# Altium PCB PCB1.PcbDoc (part 1 of 3)
Units mm, origin at the board's own origin, x right, y up, seen from the top; angles counter-clockwise.
Board outline 100 x 48 mm, 4 copper layers (Top Layer, Top GND, Bottom VM, Bottom Layer), stack 1.513 mm thick; 171 components, 136 nets, 609 pads, 571 vias.
Unrouted connection lines stored in the file: 44.
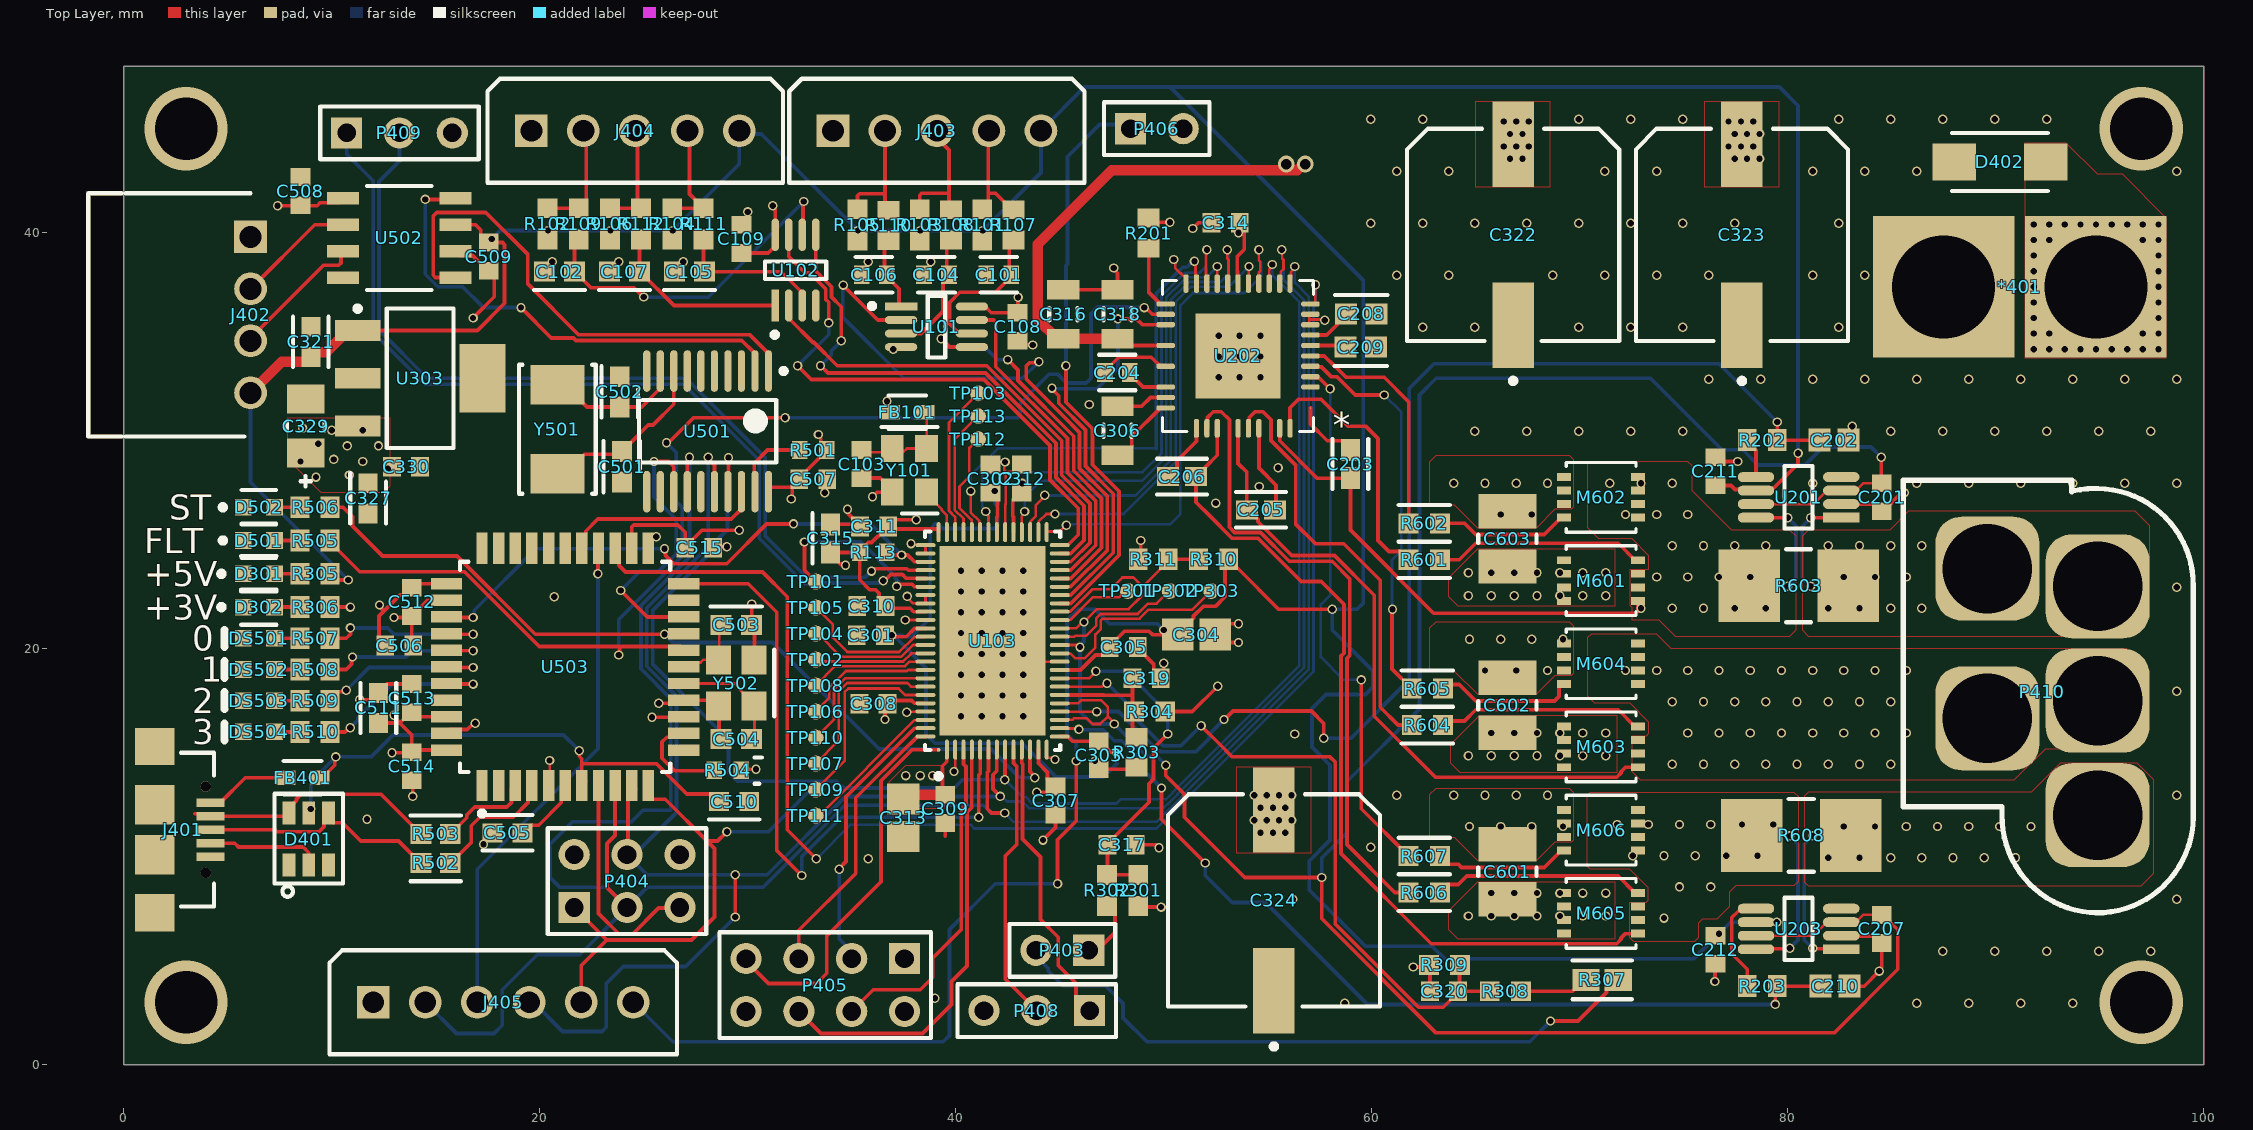
[diagram p0: Top Layer view]
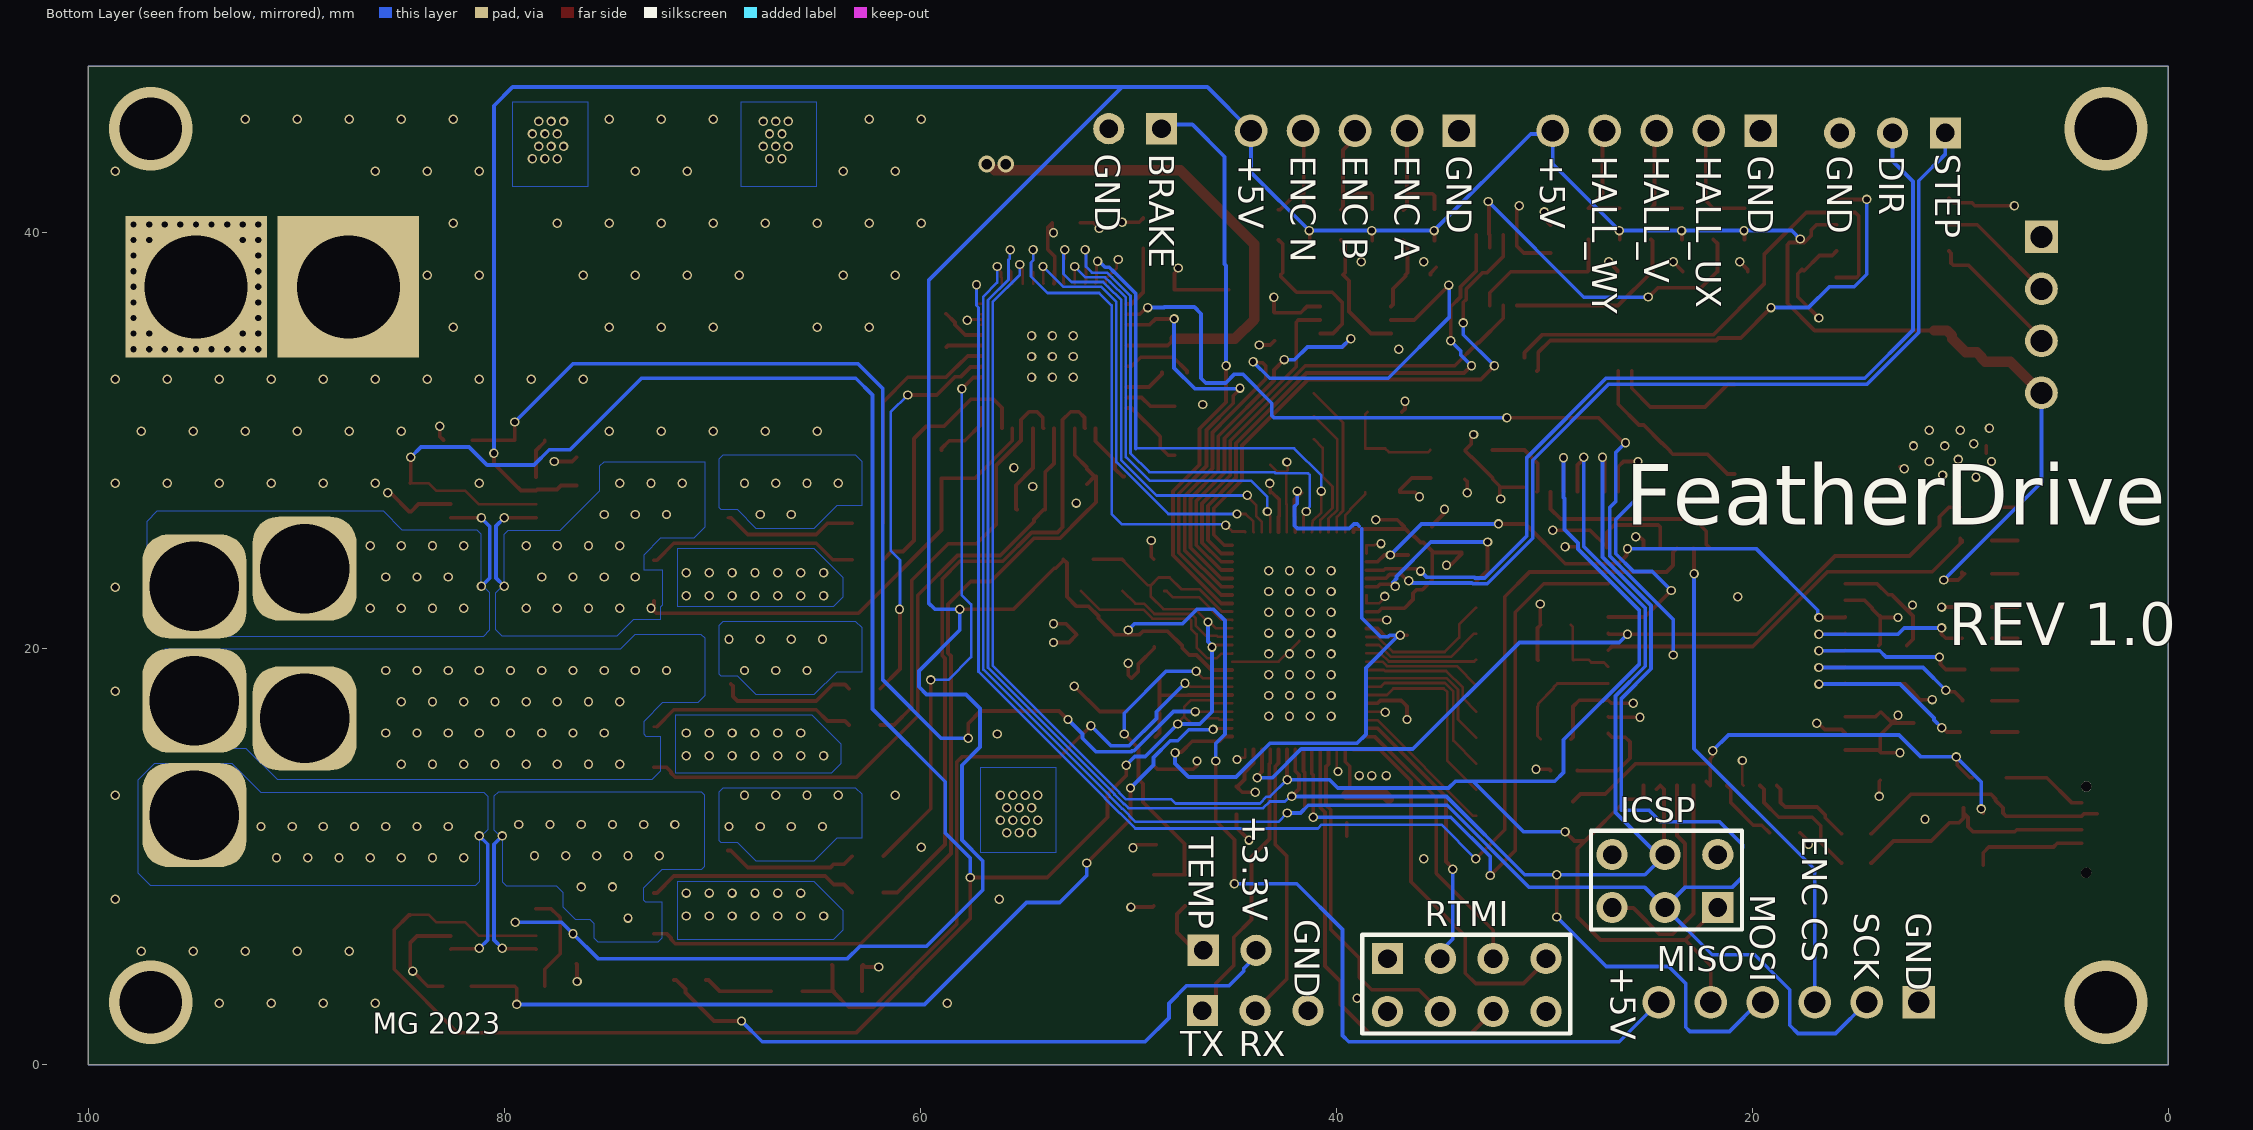
[diagram p1: Bottom Layer view, seen from below]
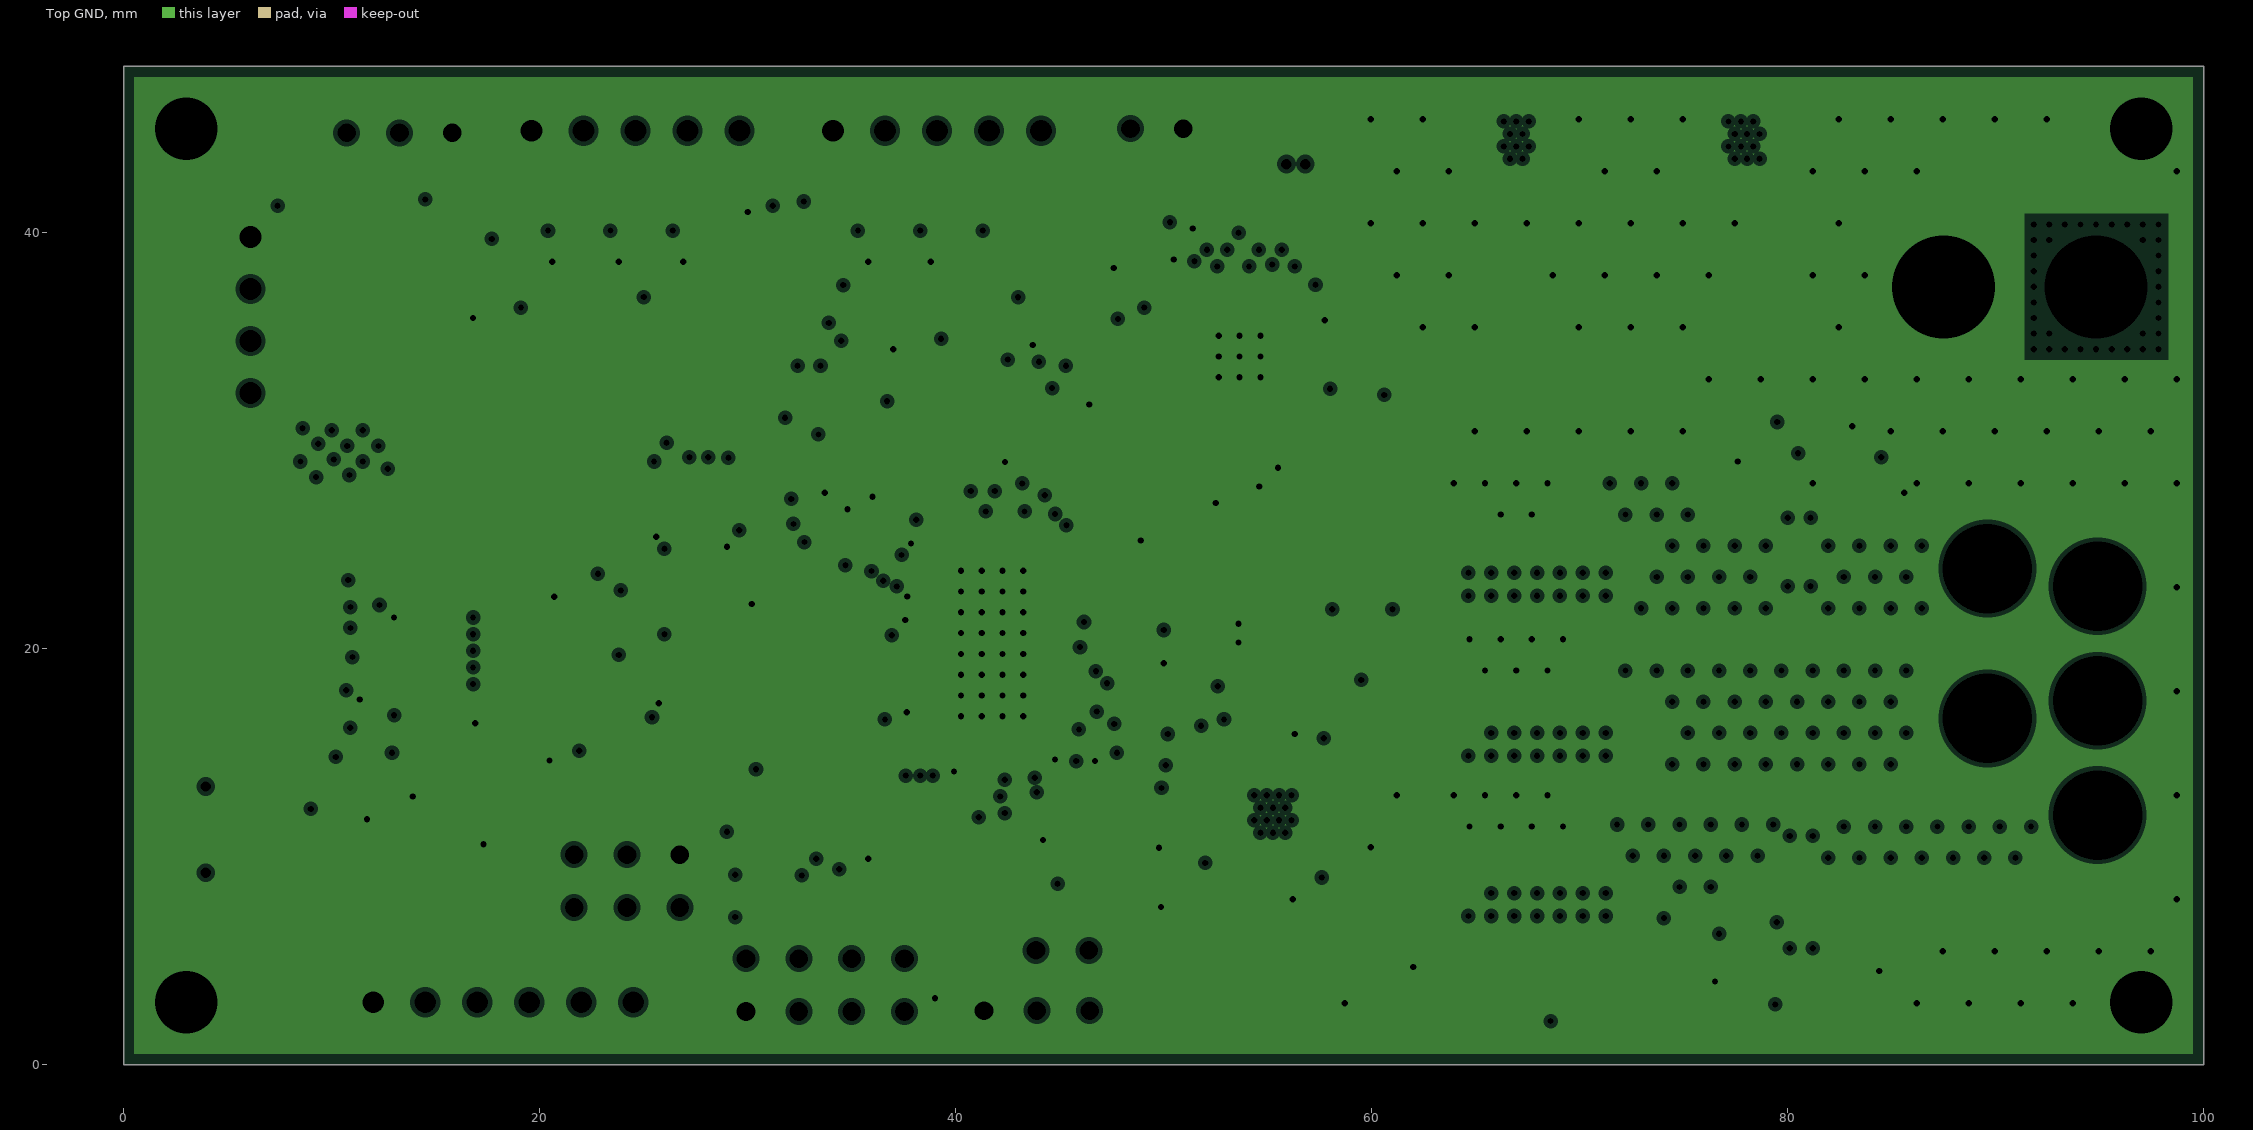
[diagram p2: Top GND, clearances drawn from the general rule]
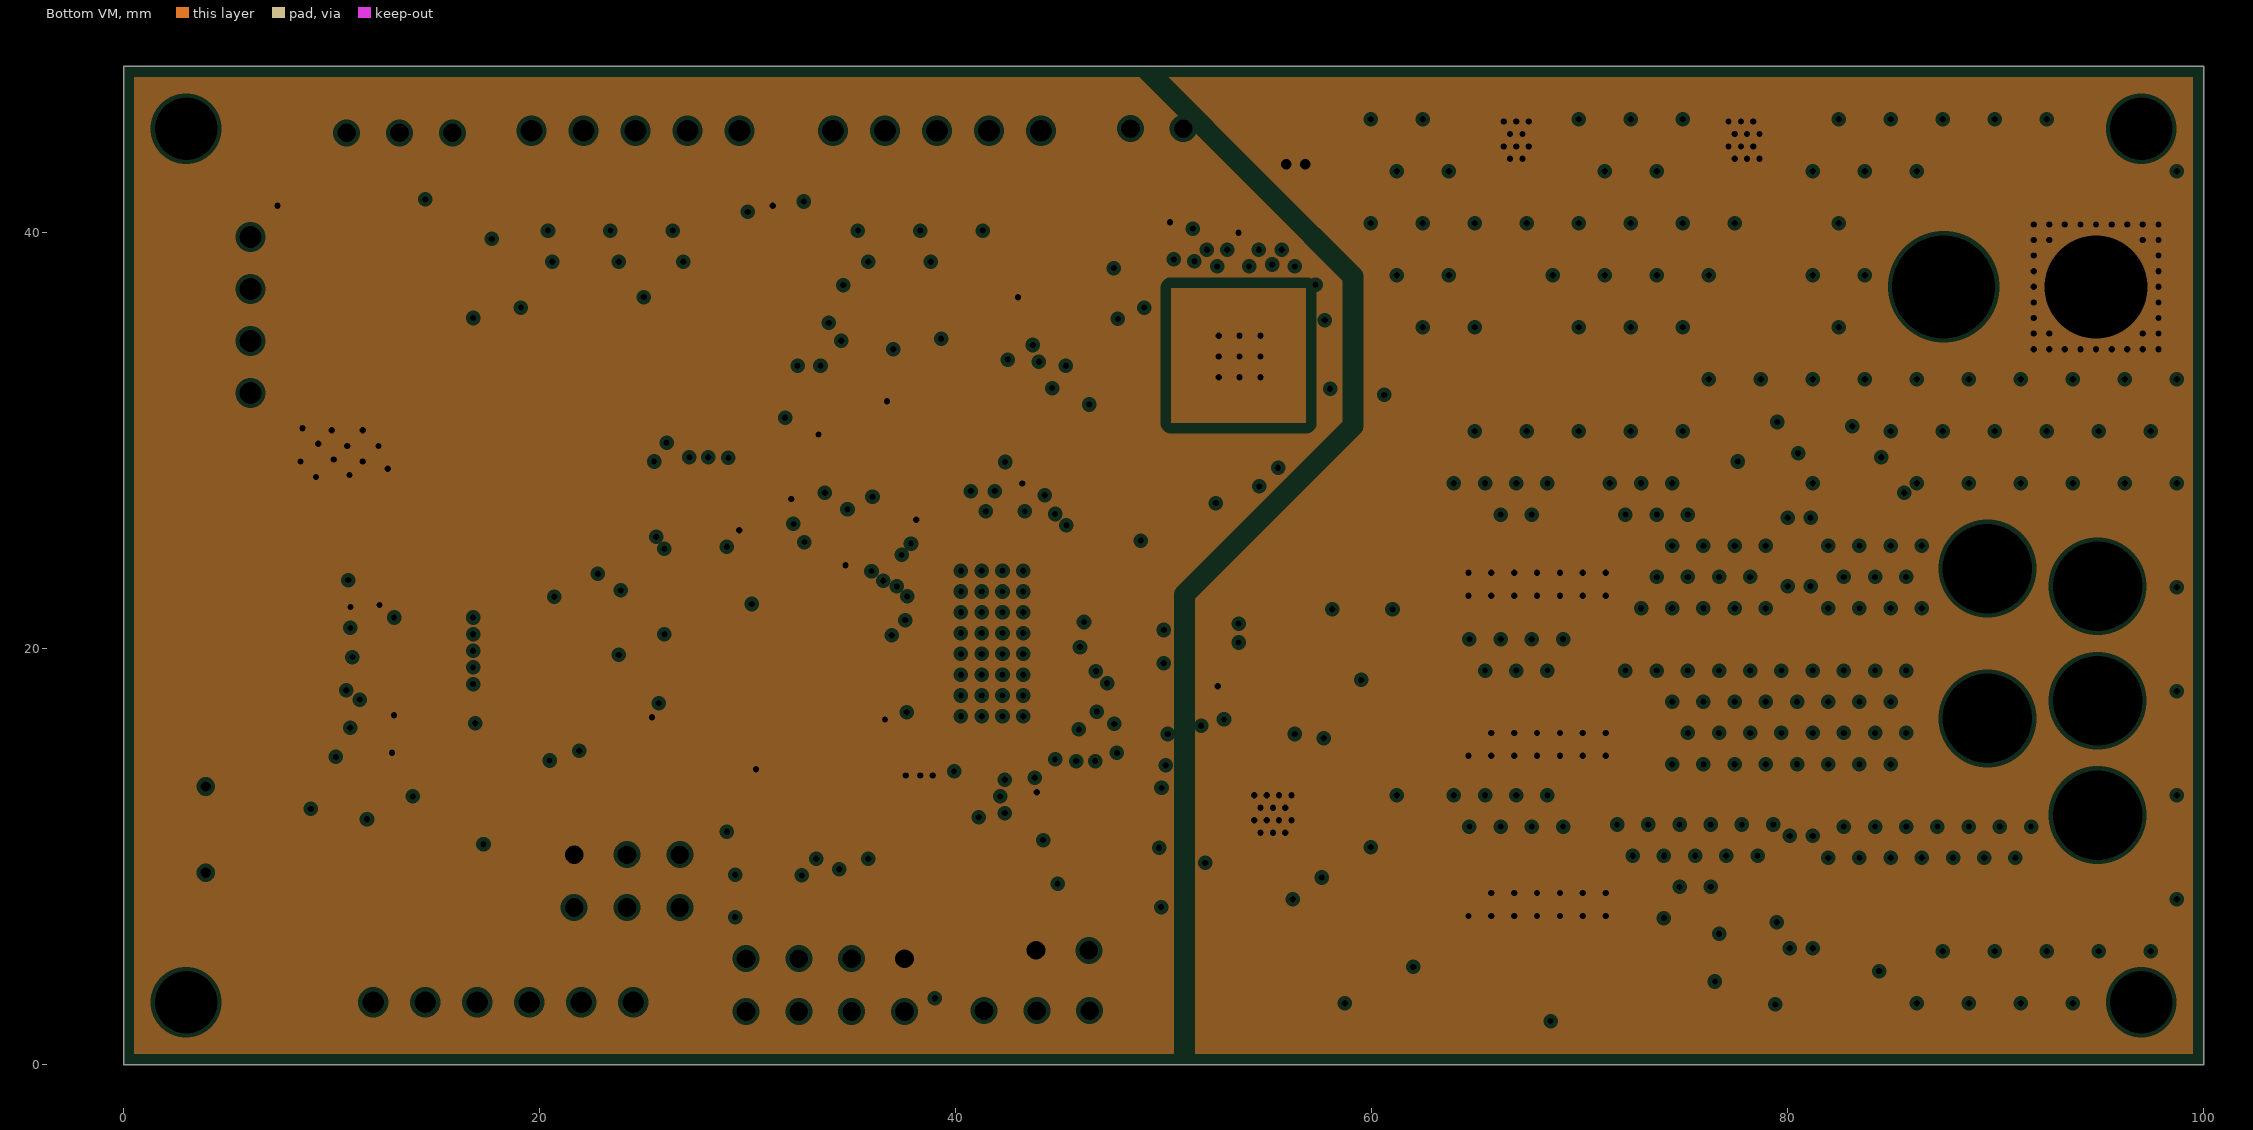
[diagram p3: Bottom VM, clearances drawn from the general rule]

## Layer stack, top to bottom
Top Solder: solder mask 0.0102, Solder Resist, Dk 3.5
Top Layer: signal copper 0.035
Dielectric 2: prepreg 0.2083, PP-022, Dk 4.5
Top GND: plane copper 0.018, net GND
Core: core 0.9906, Core-042, Dk 4.6
Bottom VM: plane copper 0.018, net (Multiple Nets)
Dielectric 3: prepreg 0.2083, PP-022, Dk 4.5
Bottom Layer: signal copper 0.035
Bottom Solder: solder mask 0.0102, Solder Resist, Dk 3.5

## Board outline
0,0 0,48 100,48 100,0

## Design rules (kind name [scope] priority, off if disabled: settings)
AssemblyTestPointUsage [All] p0: scope1count=1 scope1_0_kind=Board scope1_0_value=Board scope2count=1 scope2_0_kind=Board scope2_0_value=Board commentlength=0
AssemblyTestpoint [All] p0: scope1count=1 scope1_0_kind=Board scope1_0_value=Board scope2count=1 scope2_0_kind=Board scope2_0_value=Board commentlength=0
Clearance Clearance_POWER [All] p0 off: scope1count=1 scope1_0_kind=Board scope1_0_value=Board scope2count=1 scope2_0_kind=Board scope2_0_value=Board commentlength=162 gap=0.254 // Protel DXP Scope 1 Expression Was: (InNet('NetC205_2') OR InNet('NETC203_2') OR InNet('NETC206_2') OR InNet('NetP410_1') OR InNet('NetP410_3') OR InNet('VM'))
Clearance [All] p0: scope1count=1 scope1_0_kind=Board scope1_0_value=Board scope2count=1 scope2_0_kind=Board scope2_0_value=Board commentlength=0 gap=0.127
Clearance Clearance_POWER [(InNet('NetC205_2') OR InNet('NETC203_2') OR InNet('NETC206_2') OR InNet('NetP410_1') OR InNet('NetP410_3') OR InNet('VM'))] p1: gap=0.254 ignorepadtopadclearanceinfootprint=FALSE except(0: SMDPad-Hole THPad-Hole Via-Hole Fill-Hole Poly-Hole Region-Hole Text-Hole; 0.1: Arc-Arc Arc-Track Track-Track; 0.127: Arc-THPad Arc-Fill Arc-Poly Arc-Region Track-THPad Track-Fill Track-Poly Track-Region SMDPad-SMDPad; 0.2: Arc-SMDPad Track-SMDPad; 0.5: THPad-THPad THPad-Fill THPad-Poly THPad-Region Fill-Fill Fill-Poly Fill-Region Poly-Poly Poly-Region Region-Region)
Clearance [All] p2: gap=0.127 ignorepadtopadclearanceinfootprint=FALSE except(0: SMDPad-Hole THPad-Hole Via-Hole Fill-Hole Poly-Hole Region-Hole Text-Hole; 0.1: Arc-Arc Arc-Track Track-Track; 0.2: Arc-SMDPad Track-SMDPad THPad-Fill THPad-Poly THPad-Region Via-Fill Via-Poly Via-Region; 0.254: Arc-Via Arc-Text Arc-Hole Track-Via Track-Text Track-Hole SMDPad-THPad SMDPad-Via SMDPad-Text THPad-Via THPad-Text Via-Via Via-Text Fill-Text Poly-Text Region-Text Text-Text; 0.5: THPad-THPad)
ComponentClearance [All] p0: scope1count=1 scope1_0_kind=Board scope1_0_value=Board scope2count=1 scope2_0_kind=Board scope2_0_value=Board commentlength=0 gap=0.127 collisioncheckmode=3
ComponentClearance [All] p1: gap=0.127 collisioncheckmode=3 verticalgap=0.254 showdistances=FALSE
DiffPairsRouting [All] p0: scope1count=1 scope1_0_kind=Board scope1_0_value=Board scope2count=1 scope2_0_kind=Board scope2_0_value=Board commentlength=0
FabricationTestPointUsage [All] p0: scope1count=1 scope1_0_kind=Board scope1_0_value=Board scope2count=1 scope2_0_kind=Board scope2_0_value=Board commentlength=0 valid=0 allowmultiple=FALSE
FabricationTestpoint [All] p0: scope1count=1 scope1_0_kind=Board scope1_0_value=Board scope2count=1 scope2_0_kind=Board scope2_0_value=Board commentlength=0 side=3 testpointundercomponent=TRUE minsize=1.016 maxsize=2.54 preferedsize=1.524 minholesize=0 maxholesize=1.016 preferedholesize=0.813 testpointgrid=0.025
FanoutControl Fanout_BGA [All] p0 off: scope1count=1 scope1_0_kind=Board scope1_0_value=Board scope2count=1 scope2_0_kind=Board scope2_0_value=Board commentlength=69 // Protel DXP Scope 1 Expression Was: IsBGA   Fanout_BGA (Default Rule)
FanoutControl Fanout_LCC [All] p0 off: scope1count=1 scope1_0_kind=Board scope1_0_value=Board scope2count=1 scope2_0_kind=Board scope2_0_value=Board commentlength=69 // Protel DXP Scope 1 Expression Was: IsLCC   Fanout_LCC (Default Rule)
FanoutControl Fanout_SOIC [All] p0 off: scope1count=1 scope1_0_kind=Board scope1_0_value=Board scope2count=1 scope2_0_kind=Board scope2_0_value=Board commentlength=71 // Protel DXP Scope 1 Expression Was: IsSOIC   Fanout_SOIC (Default Rule)
FanoutControl Fanout_Small [All] p0 off: scope1count=1 scope1_0_kind=Board scope1_0_value=Board scope2count=1 scope2_0_kind=Board scope2_0_value=Board commentlength=84 // Protel DXP Scope 1 Expression Was: (CompPinCount < 5)   Fanout_Small (Default Rule)
FanoutControl Fanout_Default [All] p0: scope1count=1 scope1_0_kind=Board scope1_0_value=Board scope2count=1 scope2_0_kind=Board scope2_0_value=Board commentlength=30 // Fanout_Default (Default Rule)
Height [All] p0: scope1count=1 scope1_0_kind=Board scope1_0_value=Board scope2count=1 scope2_0_kind=Board scope2_0_value=Board commentlength=0
HoleSize [All] p0: scope1count=1 scope1_0_kind=Board scope1_0_value=Board scope2count=1 scope2_0_kind=Board scope2_0_value=Board commentlength=0 absolutevalues=TRUE maxlimit=6.5 minlimit=0.025 maxpercent=80.000 minpercent=20.000
HoleSize [All] p1: absolutevalues=TRUE maxlimit=6.5 minlimit=0.025 maxpercent=80.000 minpercent=20.000
HoleToHoleClearance [All] p0: scope1count=1 scope1_0_kind=Board scope1_0_value=Board scope2count=1 scope2_0_kind=Board scope2_0_value=Board commentlength=0
LayerPairs [All] p0: scope1count=1 scope1_0_kind=Board scope1_0_value=Board scope2count=1 scope2_0_kind=Board scope2_0_value=Board commentlength=0 enforce=TRUE
MinimumSolderMaskSliver [All] p0: scope1count=1 scope1_0_kind=Board scope1_0_value=Board scope2count=1 scope2_0_kind=Board scope2_0_value=Board commentlength=0
MinimumSolderMaskSliver [All] p1: minsoldermaskwidth=0.08
NetAntennae [All] p0: scope1count=1 scope1_0_kind=Board scope1_0_value=Board scope2count=1 scope2_0_kind=Board scope2_0_value=Board commentlength=0
PasteMaskExpansion [All] p0: scope1count=1 scope1_0_kind=Board scope1_0_value=Board scope2count=1 scope2_0_kind=Board scope2_0_value=Board commentlength=0 expansion=0
PlaneClearance [All] p0: scope1count=1 scope1_0_kind=Board scope1_0_value=Board scope2count=1 scope2_0_kind=Board scope2_0_value=Board commentlength=0 clearance=0.2
PlaneClearance [All] p1: clearance=0.2
PlaneConnect [All] p0: scope1count=1 scope1_0_kind=Board scope1_0_value=Board scope2count=1 scope2_0_kind=Board scope2_0_value=Board commentlength=0 planeconnectstyle=Direct reliefexpansion=0.508 reliefentries=4 reliefconductorwidth=0.254 reliefairgap=0.254
PlaneConnect [All] p1: planeconnectstyle=Direct reliefexpansion=0.508 reliefentries=4 reliefconductorwidth=0.254 reliefairgap=0.254
PolygonConnect PolygonConnect_GND_POWER [All] p0 off: scope1count=1 scope1_0_kind=Net scope1_0_value=GND scope2count=1 scope2_0_kind=Board scope2_0_value=Board commentlength=259 connectstyle=Direct reliefconductorwidth=0.254 reliefentries=4 polygonreliefangle="90 Angle" // Protel DXP Scope 2 Expression Was: (HasFootprint('FP-FC-G-MFG') OR HasFootprint('FP-CL32-IPC_B') OR HasFootprint('TSON Advance_TOS') OR HasFootprint('XT60+MR60') OR HasFootprint('XT-60') OR HasFootprint('FP-SMAJ-CA-MFG') OR InNamedPolygon('GND_L01_P000'))
PolygonConnect PolygonConnect_GND [All] p0: scope1count=1 scope1_0_kind=Net scope1_0_value=GND scope2count=1 scope2_0_kind=Board scope2_0_value=Board commentlength=0 connectstyle=Direct reliefconductorwidth=0.254 reliefentries=4 polygonreliefangle="90 Angle"
PolygonConnect [All] p0: scope1count=1 scope1_0_kind=Board scope1_0_value=Board scope2count=1 scope2_0_kind=Board scope2_0_value=Board commentlength=0 connectstyle=Direct reliefconductorwidth=0.254 reliefentries=4 polygonreliefangle="90 Angle"
PolygonConnect PolygonConnect_GND_POWER [InNet('GND') vs (HasFootprint('FP-FC-G-MFG') OR HasFootprint('FP-CL32-IPC_B') OR HasFootprint('TSON Advance_TOS') OR HasFootprint('XT60+MR60') OR HasFootprint('XT-60') OR HasFootprint('FP-SMAJ-CA-MFG') OR InNamedPolygon('GND_L01_P000'))] p1: connectstyle=Direct reliefconductorwidth=0.254 reliefentries=4 polygonreliefangle="90 Angle" airgapwidth=0.254
PolygonConnect PolygonConnect_GND [InNet('GND')] p2: thpad.connectstyle=Direct thpad.reliefconductorwidth=0.254 thpad.reliefentries=4 thpad.polygonreliefangle="90 Angle" thpad.airgapwidth=0.254 smdpad.connectstyle=Relief smdpad.reliefconductorwidth=0.2 smdpad.reliefentries=4 smdpad.polygonreliefangle="90 Angle" smdpad.airgapwidth=0.2 via.connectstyle=Direct via.reliefconductorwidth=0.254 via.reliefentries=4 via.polygonreliefangle="90 Angle" via.airgapwidth=0.254
PolygonConnect [All] p3: connectstyle=Direct reliefconductorwidth=0.254 reliefentries=4 polygonreliefangle="90 Angle" airgapwidth=0.254
RoutingCorners [All] p0: scope1count=1 scope1_0_kind=Board scope1_0_value=Board scope2count=1 scope2_0_kind=Board scope2_0_value=Board commentlength=0 cornerstyle=45-Degree minsetback=2.54 maxsetback=2.54
RoutingLayers [All] p0: scope1count=1 scope1_0_kind=Board scope1_0_value=Board scope2count=1 scope2_0_kind=Board scope2_0_value=Board commentlength=0 top layer=Automatic bottom layer=Automatic
RoutingPriority [All] p0: scope1count=1 scope1_0_kind=Board scope1_0_value=Board scope2count=1 scope2_0_kind=Board scope2_0_value=Board commentlength=0
RoutingTopology [All] p0: scope1count=1 scope1_0_kind=Board scope1_0_value=Board scope2count=1 scope2_0_kind=Board scope2_0_value=Board commentlength=0 topology=Shortest
RoutingVias [All] p0: scope1count=1 scope1_0_kind=Board scope1_0_value=Board scope2count=1 scope2_0_kind=Board scope2_0_value=Board commentlength=0 holewidth=0.3 width=0.45 viastyle="Through Hole" minholewidth=0.3 minwidth=0.45 maxholewidth=0.55 maxwidth=0.7
RoutingVias [All] p1: holewidth=0.3 width=0.45 viastyle="Through Hole" minholewidth=0.3 minwidth=0.45 maxholewidth=0.55 maxwidth=0.7
ShortCircuit [All] p0: scope1count=1 scope1_0_kind=Board scope1_0_value=Board scope2count=1 scope2_0_kind=Board scope2_0_value=Board commentlength=0 allowed=FALSE
SilkToBoardRegionClearance [All] p0: scope1count=1 scope1_0_kind=Board scope1_0_value=Board scope2count=1 scope2_0_kind=Board scope2_0_value=Board commentlength=0
SilkToSilkClearance [All] p0: scope1count=1 scope1_0_kind=Board scope1_0_value=Board scope2count=1 scope2_0_kind=Board scope2_0_value=Board commentlength=0
SilkToSilkClearance [All] p1: silktosilkclearance=0
SilkToSolderMaskClearance [All] p0 off: scope1count=1 scope1_0_kind=Board scope1_0_value=Board scope2count=1 scope2_0_kind=Board scope2_0_value=Board commentlength=44 // Protel DXP Scope 1 Expression Was: IsPad
SilkToSolderMaskClearance [IsPad] p1: minsilkscreentomaskgap=0.15 clearancetoexposedcopper=TRUE
SolderMaskExpansion [All] p0: scope1count=1 scope1_0_kind=Board scope1_0_value=Board scope2count=1 scope2_0_kind=Board scope2_0_value=Board commentlength=0 expansion=0.1
SolderMaskExpansion [All] p1: expansion=0.1 istentingtop=FALSE
UnRoutedNet [All] p0: scope1count=1 scope1_0_kind=Board scope1_0_value=Board scope2count=1 scope2_0_kind=Board scope2_0_value=Board commentlength=0
UnpouredPolygon [All] p0: scope1count=1 scope1_0_kind=Board scope1_0_value=Board scope2count=1 scope2_0_kind=Board scope2_0_value=Board commentlength=0
Width Width_voltage [All] p0: scope1count=1 scope1_0_kind=NetClass scope1_0_value=Voltage scope2count=1 scope2_0_kind=Board scope2_0_value=Board commentlength=0 maxlimit=0.5 minlimit=0.18 preferedwidth=0.18
Width [All] p0: scope1count=1 scope1_0_kind=Board scope1_0_value=Board scope2count=1 scope2_0_kind=Board scope2_0_value=Board commentlength=0 maxlimit=0.5 minlimit=0.127 preferedwidth=0.18
Width Width_voltage [InNetClass('Voltage')] p1: maxlimit=0.5 minlimit=0.18 preferedwidth=0.18 minimp=50.000000 maximp=50.000000 favimp=50.000000
Width [All] p2: maxlimit=0.5 minlimit=0.127 preferedwidth=0.18 minimp=50.000000 maximp=50.000000 favimp=50.000000
23 further rules are at their usual default settings.

## Classes and differential pairs
component class Designator: C201 C202 C203 C204 C205 C206 C207 C208 C209 C210 C211 C212 R201 R202 R203 U201 U202 U203
component class Designator: C601 C602 C603 M601 M602 M603 M604 M605 M606 R601 R602 R603 R604 R605 R606 R607 R608
component class Designator: C101 C102 C103 C104 C105 C106 C107 C108 C109 FB101 R101 R102 R103 R104 R105 R106 R107 R108 R109 R110 R111 R112 R113 TP101 TP102 TP103 TP104 TP105 TP106 TP107 TP108 TP109 TP110 TP111 TP112 TP113 U101 U102 U103 Y101

## Components (designator, comment, footprint, x,y, rotation, side; value= is the part's Value field where it differs from the comment)
*401 "XT-60 Connector" XT-60 99.209,41.439 r180 top
C101 "1nF" FP-C0603C-CF-MFG 42.077,37.977 r180 top
C102 "100pF" FP-C0603C-CF-IPC_B 20.951,38.127 r180 top
C103 "100nF" CAPC1608X90X35NL10T15 35.477,28.877 r270 top
C104 "1nF" FP-C0603C-CF-MFG 39.077,37.977 r180 top
C105 "100pF" FP-C0603C-CF-IPC_B 27.203,38.127 r180 top
C106 "1nF" FP-C0603C-CF-MFG 36.077,37.977 r180 top
C107 "100pF" FP-C0603C-CF-IPC_B 24.077,38.127 r180 top
C108 "100nF" CAPC1608X90X35NL10T15 42.977,35.477 r270 top
C109 "100nF" CAPC1608X90X35NL10T15 29.7,39.7 r90 top
C201 "100nF" CAPC1608X90X35NL10T15 84.527,27.277 r270 top
C202 "2.2nF" CAPC1608X95X40ML15T15 82.227,30.027 r180 top
C203 "470nF" FP-0603-L_1_6_0_1-W_0_8_0-IPC_B 58.977,28.877 r270 top
C204 "22nF" FP-C0603C-CF-MFG 47.777,33.277 r180 top
C205 "470nF" FP-0603-L_1_6_0_1-W_0_8_0-IPC_B 54.677,26.677 r180 top
C206 "470nF" FP-0603-L_1_6_0_1-W_0_8_0-IPC_B 50.877,28.277 r0 top
C207 "100nF" CAPC1608X90X35NL10T15 84.527,6.527 r270 top
C208 "2.2uF" FP-0603-L_1_6_0_2-W_0_8_0-IPC_B 59.5,36.1 r0 top
C209 "2.2uF" FP-0603-L_1_6_0_2-W_0_8_0-IPC_B 59.473,34.5 r0 top
C210 "2.2nF" CAPC1608X95X40ML15T15 82.277,3.777 r180 top
C211 "100nF" CAPC1608X90X35NL10T15 76.527,28.527 r90 top
C212 "100nF" CAPC1608X90X35NL10T15 76.527,5.527 r270 top
C301 "100nF" CAPC1608X90X35NL10T15 35.925,20.65 r0 top
C302 "100nF" CAPC1608X90X35NL10T15 41.677,28.177 r270 top
C303 "100nF" CAPC1608X90X35NL10T15 46.877,14.877 r90 top
C304 "4.7uF" CAPC2013X145X50ML20T25 51.577,20.677 r180 top
C305 "100nF" CAPC1608X90X35NL10T15 48.077,20.077 r180 top
C306 "100nF" CAPC2013X145X20ML20 47.777,30.477 r90 top
C307 "100nF" CAPC1608X90X35NL10T15 44.8,12.7 r90 top
C308 "100nF" CAPC1608X90X35NL10T15 36.05,17.35 r0 top
C309 "100nF" CAPC1608X90X35NL10T15 39.5,12.3 r90 top
C310 "100nF" CAPC1608X90X35NL10T15 35.95,22.05 r0 top
C311 "100nF" CAPC1608X90X35NL10T15 36.077,25.877 r0 top
C312 "100nF" CAPC1608X90X35NL10T15 43.177,28.177 r270 top
C313 "4.7uF" CAPC2013X145X50ML20T25 37.477,11.877 r90 top
C314 "100nF" CAPC1608X90X35NL10T15 52.977,40.477 r0 top
C315 "470nF" FP-0603-L_1_6_0_1-W_0_8_0-IPC_B 33.977,25.304 r270 top
C316 "100nF" CAPC2013X145X20ML20 45.177,36.077 r90 top
C317 "100nF" CAPC1608X90X35NL10T15 47.977,10.577 r180 top
C318 "100nF" CAPC2013X145X20ML20 47.777,36.077 r90 top
C319 "100nF" CAPC1608X90X35NL10T15 49.177,18.577 r180 top
C320 "100nF" CAPC1608X90X35NL10T15 63.477,3.527 r0 top
C321 "1uF" FP-CL10-IPC_B 9,34.75 r90 top
C322 "390uF" FP-FC-G-MFG 66.8,39.9 r90 top locked
C323 "390uF" FP-FC-G-MFG 77.8,39.9 r90 top locked
C324 "390uF" FP-FC-G-MFG 55.3,7.9 r90 top locked
C327 "1uF" FP-CL10-IPC_B 11.75,27.227 r270 top
C329 "10uF" FP-TAJA-MFG 8.75,30.7 r270 top
C330 "100nF" CAPC1608X90X35NL10T15 13.575,28.75 r180 top
C501 "18pF" FP-C0603C-CF-IPC_B 23.95,28.75 r90 top
C502 "18pF" FP-C0603C-CF-IPC_B 23.85,32.35 r90 top
C503 "18pF" FP-C0603C-CF-IPC_B 29.45,21.15 r0 top
C504 "18pF" FP-C0603C-CF-IPC_B 29.45,15.65 r180 top
C505 "1uF" FP-CL10-IPC_B 18.45,11.15 r0 top
C506 "100nF" CAPC1608X90X35NL10T15 13.25,20.15 r0 top
C507 "100nF" CAPC1608X90X35NL10T15 33.15,28.15 r180 top
C508 "100nF" CAPC1608X90X35NL10T15 8.5,42 r270 top
C509 "100nF" CAPC1608X90X35NL10T15 17.55,38.85 r90 top
C510 "1uF" FP-CL10-IPC_B 29.35,12.65 r0 top
C511 "1uF" FP-CL10-IPC_B 12.25,17.15 r90 top
C512 "100nF" CAPC1608X90X35NL10T15 13.85,22.25 r90 top
C513 "100nF" CAPC1608X90X35NL10T15 13.85,17.625 r270 top
C514 "100nF" CAPC1608X90X35NL10T15 13.85,14.35 r90 top
C515 "100nF" CAPC1608X90X35NL10T15 27.675,24.85 r180 top
C601 "2.2uF" FP-CL32-IPC_B 66.527,9.277 r90 top
C602 "2.2uF" FP-CL32-IPC_B 66.527,17.277 r90 top
C603 "2.2uF" FP-CL32-IPC_B 66.527,25.277 r90 top
D301 "GREEN" FP-LTST-C190GKT-MFG 6.5,23.6 r0 top
D302 "GREEN" FP-LTST-C190GKT-MFG 6.5,22 r0 top
D401 "824001" SOT23_6L 8.9,10.85 r90 top
D402 "SMAJ36CA" FP-SMAJ-CA-MFG 90.2,43.4 r0 top
D501 "RED" FP-LTST-C190KRKT-MFG 6.5,25.2 r0 top
D502 "RED" FP-LTST-C190KRKT-MFG 6.5,26.8 r0 top
DS501 "LTST-C190TBKT" LTST-C190TBKT-2_V 6.5,20.5 r180 top
DS502 "LTST-C190TBKT" LTST-C190TBKT-2_V 6.5,19 r180 top
DS503 "LTST-C190TBKT" LTST-C190TBKT-2_V 6.5,17.5 r180 top
DS504 "LTST-C190TBKT" LTST-C190TBKT-2_V 6.5,16 r180 top
FB101 "600R" FP-742792651-MFG 37.677,31.377 r0 top
FB401 "600R" FP-742792651-MFG 8.6,13.8 r180 top
J401 "629105136821" 629105136821 1.5,11.3 r270 top
J402 "CAN" SHDRRA4W60P0X250_1X4_1170X750X510P 6.1,39.8 r90 top
J403 "ENCODER" PTSM5 34.1,44.9 r180 top
J404 "HALL" PTSM5 19.6,44.9 r180 top
J405 "ENC_SPI" PTSM6 12,3 r180 top
M601 "TPN19008QM" "TSON Advance_TOS" 71.027,23.277 r180 top locked
M602 "TPN19008QM" "TSON Advance_TOS" 71.027,27.277 r0 top locked
M603 "TPN19008QM" "TSON Advance_TOS" 71.027,15.277 r180 top locked
M604 "TPN19008QM" "TSON Advance_TOS" 71.027,19.277 r0 top locked
M605 "TPN19008QM" "TSON Advance_TOS" 71.027,7.277 r180 top locked
M606 "TPN19008QM" "TSON Advance_TOS" 71.027,11.277 r0 top locked
P403 "TEMP" HDR1X2 46.4,5.5 r180 top
P404 "ICSP" HDR2X3 21.66,7.56 r0 top
P405 "DEBUG" HDR2X4 37.54,5.1 r180 top
P406 "BRAKE" HDR1X2 48.4,45 r0 top
P408 "UART" HDR1X3 46.44,2.6 r180 top
P409 "STEP" HDR1X3 10.72,44.8 r0 top
P410 "XT60+MR60" XT60+MR60 94.9,17.5 r270 top locked
R101 "4.7k" RESC1608X55X30NL15T15 41.277,40.377 r270 top
R102 "4.7k" RESC1608X55X30NL15T15 20.377,40.427 r270 top
R103 "4.7k" RESC1608X55X30NL15T15 38.277,40.377 r270 top
R104 "4.7k" RESC1608X55X30NL15T15 26.377,40.427 r270 top
R105 "4.7k" RESC1608X55X30NL15T15 35.277,40.377 r270 top
R106 "4.7k" RESC1608X55X30NL15T15 23.377,40.427 r270 top
R107 "1k" RESC1608X55X30ML15T15 42.777,40.377 r270 top
R108 "1k" RESC1608X55X30ML15T15 39.777,40.377 r270 top
R109 "4.7k" RESC1608X55X30NL15T15 21.877,40.427 r90 top
R110 "1k" RESC1608X55X30ML15T15 36.777,40.352 r270 top
R111 "4.7k" RESC1608X55X30NL15T15 27.877,40.427 r90 top
R112 "4.7k" RESC1608X55X30NL15T15 24.877,40.427 r90 top
R113 "10K" RESC1609X55X30LL15T15 36.035,24.635 r180 top
R201 "1k" RESC1608X55X30ML15T15 49.277,39.977 r90 top
R202 "1k" RESC1608X55X30ML15T15 78.777,30.027 r0 top
R203 "1k" RESC1608X55X30ML15T15 78.777,3.777 r0 top
R301 "4.7K" RESC1608X55X30NL15T15 48.777,8.377 r90 top
R302 "4.7K" RESC1608X55X30NL15T15 47.277,8.377 r270 top
R303 "1k" RESC1608X55X30ML15T15 48.7,15.025 r90 top
R304 "47K" RESC1608X55X30NL15T15 49.327,16.977 r0 top
R305 "1k" RESC1608X55X30ML15T15 9.2,23.6 r0 top
R306 "1k" RESC1608X55X30ML15T15 9.2,22 r0 top
R307 "10K NTC" FP-NCP18-0_15-IPC_A 71.077,4.077 r0 top
R308 "4.7K" RESC1608X55X30NL15T15 66.427,3.527 r0 top
R309 "4.7K" RESC1608X55X30NL15T15 63.5,4.8 r0 top
R310 "1k" RESC1608X55X30ML15T15 52.4,24.3 r0 top
R311 "1k" RESC1608X55X30ML15T15 49.5,24.3 r0 top
R501 "10K" RESC1609X55X30LL15T15 33.15,29.55 r0 top
R502 "22R" FP-RMCF0603-IPC_B 15,9.7 r0 top
R503 "22R" FP-RMCF0603-IPC_B 15,11.1 r0 top
R504 "10K" RESC1609X55X30LL15T15 29.05,14.15 r0 top
R505 "1k" RESC1608X55X30ML15T15 9.2,25.2 r0 top
R506 "1k" RESC1608X55X30ML15T15 9.2,26.8 r0 top
R507 "1k" RESC1608X55X30ML15T15 9.2,20.5 r0 top
R508 "1k" RESC1608X55X30ML15T15 9.2,19 r0 top
R509 "1k" RESC1608X55X30ML15T15 9.2,17.5 r0 top
R510 "1k" RESC1608X55X30ML15T15 9.2,16 r0 top
R601 "10R" FP-ERJ3EK-IPC_B 62.526,24.277 r0 top
R602 "10R" FP-ERJ3EK-IPC_B 62.527,26.027 r0 top
R603 "R003" FP-CRE2512-R001-R004-IPC_A 80.527,23.027 r0 top locked
R604 "10R" FP-ERJ3EK-IPC_B 62.677,16.327 r0 top
R605 "10R" FP-ERJ3EK-IPC_B 62.677,18.077 r0 top
R606 "10R" FP-ERJ3EK-IPC_B 62.527,8.277 r0 top
R607 "10R" FP-ERJ3EK-IPC_B 62.527,10.027 r0 top
R608 "R003" FP-CRE2512-R001-R004-IPC_A 80.653,11.027 r0 top locked
TP101 "TestPoint" PCBComponent_1#1 33.277,23.227 r270 top locked
TP102 "TestPoint" PCBComponent_1#1 33.277,19.477 r90 top locked
TP103 "TestPoint" PCBComponent_1#1 41.077,32.277 r90 top locked
TP104 "TestPoint" PCBComponent_1#1 33.277,20.727 r90 top locked
TP105 "TestPoint" PCBComponent_1#1 33.277,21.977 r90 top locked
TP106 "TestPoint" PCBComponent_1#1 33.277,16.977 r90 top locked
TP107 "TestPoint" PCBComponent_1#1 33.277,14.477 r90 top locked
TP108 "TestPoint" PCBComponent_1#1 33.277,18.227 r270 top locked
TP109 "TestPoint" PCBComponent_1#1 33.277,13.227 r90 top locked
TP110 "TestPoint" PCBComponent_1#1 33.277,15.727 r90 top locked
TP111 "TestPoint" PCBComponent_1#1 33.277,11.977 r270 top locked
TP112 "TestPoint" PCBComponent_1#1 41.077,30.077 r90 top locked
TP113 "TestPoint" PCBComponent_1#1 41.077,31.177 r90 top locked
TP301 "TestPoint" PCBComponent_1#1 48.277,22.777 r90 top locked
TP302 "TestPoint" PCBComponent_1#2 50.277,23.377 r90 top locked
TP303 "TestPoint" PCBComponent_1#3 51.777,23.277 r90 top locked
U101 "SN74LVC3G17DCTR" FP-DCT0008A-IPC_B 39.077,35.477 r0 top
U102 "SN74LVC3G17DCTR" FP-DCT0008A-IPC_B 32.3,38.2 r90 top
U103 "TMC4671-LA" FP-TMC4671-LA-IPC_A 41.777,20.377 r90 top locked
U201 "AD8418BRMZ" FP-RM-8-IPC_B 80.527,27.277 r180 top
U202 "TMC6100-LA" QFN37_7X7_TRI-M 53.577,34.077 r180 top locked
U203 "AD8418BRMZ" FP-RM-8-IPC_B 80.527,6.527 r180 top
U303 "TC1262-3.3VDBTR" SOT-223-DB3_N 14.25,33 r0 top
U501 "MCP2515-I/ST" TSSOP-ST20_M 28.075,30.45 r270 top
U502 "MCP2562FDT-E/SN" FP-C04-057-SN-MFG 13.25,39.75 r180 top
U503 "ATMEGA32U4RC-AUR" FP-ML-MFG 21.227,19.127 r90 top locked
Y101 "ASE-25.000MHZ-LR-T" FP-ASE-MFG 37.777,28.577 r270 top
Y501 "8MHz" FP-ABM7-MFG 20.85,30.55 r90 top
Y502 "16MHz" FP-ABM8G-MFG 29.45,18.35 r270 top

## Footprints (in the part's own frame and the unit in brackets; to place one, negate y for a bottom-side part, rotate by r counter-clockwise, add the part's x,y. Pads: shape width x height; smd on the part's side, far side on the other; paste and mask are expansions set on the pad)
629105136821 [mm] "Micro USB 2.0 SMT Type B Horizontal 5 Contacts"
  rect 0.4x1.35 smd: 1(-1.3,2.675) 2(-0.65,2.675) 3(0,2.675) 4(0.65,2.675) 5(1.3,2.675)
  round 0.5 hole 0.5 unplated: MH1(-2.075,2.45) MH2(2.075,2.45)
  rect 1.8x1.9 smd: Shell(-4,0) Shell(4,0)
  rect 1.9x1.9 smd: Shell(-1.2,0) Shell(1.2,0)
  silkscreen extent -3.7,1.25 3.7,2.85
CAPC1608X90X35NL10T15 [mm] "Chip Capacitor, 2-Leads, Body 1.7x0.9mm, IPC Medium Density"
  rect 0.85x0.95 smd: 1(-0.675,0) 2(0.675,0)
CAPC1608X95X40ML15T15 [mm] "Chip Capacitor, 2-Leads, Body 1.60x0.80mm, IPC Low Density"
  rect 1.05x1.1 smd: 1(-0.7,0) 2(0.7,0)
CAPC2013X145X20ML20 [mm] "Chip Capacitor, 2-Leads, Body 2.20x1.45mm, IPC Low Density"
  rect 0.95x1.55 smd: 1(-1.175,0) 2(1.175,0)
  silkscreen extent -0.3,-0.68 0.3,0.68
CAPC2013X145X50ML20T25 [mm] "Chip Capacitor, 2-Leads, Body 2.00x1.25mm, IPC Low Density"
  rect 1.5x1.55 smd: 1(-0.9,0) 2(0.9,0)
FP-0603-L_1_6_0_1-W_0_8_0-IPC_B [mm]
  rect 1.058x0.912 smd paste+0 mask+0: 1(-0.677,0) 2(0.677,0)
  silkscreen extent -1.21,-0.86 1.21,0.86
FP-0603-L_1_6_0_2-W_0_8_0-IPC_B [mm]
  rect 1.058x1.012 smd paste+0 mask+0: 1(-0.727,0) 2(0.727,0)
  silkscreen extent -1.26,0.91 1.26,0.91
FP-742792651-MFG [mm]
  rect 0.95x0.7 smd paste+0 mask+0: 1(-0.825,0) 2(0.825,0)
  silkscreen extent -0.9,-0.8 0.9,0.8
FP-ABM7-MFG [mm]
  rect 1.9x2.6 smd paste+0 mask+0: 1(-2.15,0) 2(2.15,0)
  silkscreen extent -3.1,-1.85 3.1,1.85
FP-ABM8G-MFG [mm]
  rect 1.4x1.2 smd paste+0 mask+0: 1(-1.1,-0.85) 2(1.1,-0.85) 3(1.1,0.85) 4(-1.1,0.85)
  silkscreen extent -1.6,1.82 1.6,1.82
FP-ASE-MFG [mm]
  rect 1.3x1.1 smd paste+0 mask+0: 1(-1.05,-0.825) 2(1.05,-0.825) 3(1.05,0.825) 4(-1.05,0.825)
  silkscreen extent -2.07,-1.35 2.08,1.35
FP-C04-057-SN-MFG [mm]
  rect 1.55x0.6 smd paste+0 mask+0: 1(-2.7,1.905) 2(-2.7,0.635) 3(-2.7,-0.635) 4(-2.7,-1.905) 5(2.7,-1.905) 6(2.7,-0.635) 7(2.7,0.635) 8(2.7,1.905)
  silkscreen extent -1.55,-2.5 1.55,2.5
FP-C0603C-CF-IPC_B [mm]
  rect 1.007x0.958 smd paste+0 mask+0: 1(-0.726,0) 2(0.726,0)
  silkscreen extent -1.23,0.88 1.23,0.88
FP-C0603C-CF-MFG [mm]
  rect 0.75x0.9 smd paste+0 mask+0: 1(-0.6,0) 2(0.6,0)
  silkscreen extent -0.87,-0.85 0.88,0.85
FP-CL10-IPC_B [mm]
  rect 0.958x0.912 smd paste+0 mask+0: 1(-0.727,0) 2(0.727,0)
  silkscreen extent -1.21,-0.86 1.21,0.86
FP-CL32-IPC_B [mm]
  rect 1.653x2.804 smd paste+0 mask+0: 1(-1.325,0) 2(1.325,0)
  silkscreen extent -0.2,-1.4 0.2,1.4
FP-CRE2512-R001-R004-IPC_A [mm]
  rect 2.955x3.506 smd paste+0 mask+0: 1(-2.376,0) 2(2.376,0)
  silkscreen extent -0.6,-1.75 0.6,1.75
FP-DCT0008A-IPC_B [mm]
  rect 1.554x0.376 smd paste+0 mask+0: 1(-1.7,0.975)
  rrect100% 1.554x0.376 smd paste+0 mask+0: 2(-1.7,0.325) 3(-1.7,-0.325) 4(-1.7,-0.975) 5(1.7,-0.975) 6(1.7,-0.325) 7(1.7,0.325) 8(1.7,0.975)
  silkscreen extent -3.23,-1.48 0.42,1.47
FP-ERJ3EK-IPC_B [mm]
  rect 0.957x0.962 smd paste+0 mask+0: 1(-0.751,0) 2(0.751,0)
  silkscreen extent -1.23,-0.88 1.23,0.88
FP-FC-G-MFG [mm]
  rect 4.1x2 smd paste+0 mask+0: 1(-4.35,0) 2(4.35,0)
  silkscreen extent -7.15,-5.1 5.1,5.1
FP-LTST-C190GKT-MFG [mm]
  rect 0.8x0.8 smd paste+0 mask+0: 1(-0.75,0) 2(0.75,0)
  silkscreen extent -1.92,-0.85 0.85,0.85
FP-LTST-C190KRKT-MFG [mm]
  rect 0.8x0.8 smd paste+0 mask+0: 1(-0.75,0) 2(0.75,0)
  silkscreen extent -1.85,-0.83 0.82,0.83
FP-ML-MFG [mm]
  rect 1.5x0.55 smd paste+0 mask+0: 1(-5.7,4) 2(-5.7,3.2) 3(-5.7,2.4) 4(-5.7,1.6) 5(-5.7,0.8) 6(-5.7,0) 7(-5.7,-0.8) 8(-5.7,-1.6) 9(-5.7,-2.4) 10(-5.7,-3.2) 11(-5.7,-4) 23(5.7,-4) 24(5.7,-3.2) 25(5.7,-2.4) 26(5.7,-1.6) 27(5.7,-0.8) 28(5.7,0) 29(5.7,0.8) 30(5.7,1.6) 31(5.7,2.4) 32(5.7,3.2) 33(5.7,4)
  rect 0.55x1.5 smd paste+0 mask+0: 12(-4,-5.7) 13(-3.2,-5.7) 14(-2.4,-5.7) 15(-1.6,-5.7) 16(-0.8,-5.7) 17(0,-5.7) 18(0.8,-5.7) 19(1.6,-5.7) 20(2.4,-5.7) 21(3.2,-5.7) 22(4,-5.7) 34(4,5.7) 35(3.2,5.7) 36(2.4,5.7) 37(1.6,5.7) 38(0.8,5.7) 39(0,5.7) 40(-0.8,5.7) 41(-1.6,5.7) 42(-2.4,5.7) 43(-3.2,5.7) 44(-4,5.7)
  silkscreen extent -7.17,-5.05 5.05,5.05
FP-NCP18-0_15-IPC_A [mm]
  rect 1.306x1.058 smd paste+0 mask+0: 1(-0.776,0) 2(0.776,0)
  silkscreen extent -1.43,-0.93 1.43,0.93
FP-RM-8-IPC_B [mm]
  rect 1.754x0.476 smd paste+0 mask+0: 1(-2.05,0.975)
  rrect100% 1.754x0.476 smd paste+0 mask+0: 2(-2.05,0.325) 3(-2.05,-0.325) 4(-2.05,-0.975) 5(2.05,-0.975) 6(2.05,-0.325) 7(2.05,0.325) 8(2.05,0.975)
  silkscreen extent -0.67,-1.5 0.67,1.5
FP-RMCF0603-IPC_B [mm]
  rect 1.006x0.958 smd paste+0 mask+0: 1(-0.701,0) 2(0.701,0)
  silkscreen extent -1.2,-0.88 1.2,-0.88
FP-SMAJ-CA-MFG [mm]
  rect 2.1x1.8 smd paste+0 mask+0: 1(-2.2,0) 2(2.2,0)
  silkscreen extent -2.3,-1.4 2.3,1.4
FP-TAJA-MFG [mm]
  rect 1.4x1.8 smd paste+0 mask+0: 1(-1.3,0) 2(1.3,0)
  silkscreen extent -0.23,-0.9 2.9,0.9
FP-TMC4671-LA-IPC_A [mm]
  round 0.173 smd paste+0 mask+0: 1(-5.236,2.6)
  rrect100% 0.961x0.192 smd paste+0 mask+0: 2(-5.226,2.2) 3(-5.226,1.8) 4(-5.226,1.4) 5(-5.226,1) 6(-5.226,0.6) 7(-5.226,0.2) 8(-5.226,-0.2) 9(-5.226,-0.6) 10(-5.226,-1) 11(-5.226,-1.4) 12(-5.226,-1.8) 13(-5.226,-2.2) 14(-5.226,-2.6) 39(5.226,-2.6) 40(5.226,-2.2) 41(5.226,-1.8) 42(5.226,-1.4) 43(5.226,-1) 44(5.226,-0.6) 45(5.226,-0.2) 46(5.226,0.2) 47(5.226,0.6) 48(5.226,1) 49(5.226,1.4) 50(5.226,1.8) 51(5.226,2.2) 52(5.226,2.6)
  rrect100% 0.192x0.961 smd paste+0 mask+0: 15(-4.6,-3.226) 16(-4.2,-3.226) 17(-3.8,-3.226) 18(-3.4,-3.226) 19(-3,-3.226) 20(-2.6,-3.226) 21(-2.2,-3.226) 22(-1.8,-3.226) 23(-1.4,-3.226) 24(-1,-3.226) 25(-0.6,-3.226) 26(-0.2,-3.226) 27(0.2,-3.226) 28(0.6,-3.226) 29(1,-3.226) 30(1.4,-3.226) 31(1.8,-3.226) 32(2.2,-3.226) 33(2.6,-3.226) 34(3,-3.226) 35(3.4,-3.226) 36(3.8,-3.226) 37(4.2,-3.226) 38(4.6,-3.226) 53(4.6,3.226) 54(4.2,3.226) 55(3.8,3.226) 56(3.4,3.226) 57(3,3.226) 58(2.6,3.226) 59(2.2,3.226) 60(1.8,3.226) 61(1.4,3.226) 62(1,3.226) 63(0.6,3.226) 64(0.2,3.226) 65(-0.2,3.226) 66(-0.6,3.226) 67(-1,3.226) 68(-1.4,3.226) 69(-1.8,3.226) 70(-2.2,3.226) 71(-2.6,3.226) 72(-3,3.226) 73(-3.4,3.226) 74(-3.8,3.226) 75(-4.2,3.226)
  rrect100% 0.192x0.96 smd paste+0 mask+0: 76(-4.6,3.226)
  rect 9.1x5.1 smd paste-1000 mask+0: 77(0,0)
  silkscreen extent -6.63,-3.25 5.25,3.25
HDR1X2 [mm] "Connector; Header; 2 Position"
  rect 1.5x1.5 hole 0.9: 1(0,0)
  round 1.5 hole 0.9: 2(2.54,0)
  silkscreen extent -1.27,-1.27 3.81,1.27
HDR1X3 [mm] "Connector; Header; 3 Position"
  rect 1.5x1.5 hole 0.9: 1(0,0)
  round 1.5 hole 0.9: 2(2.54,0) 3(5.08,0)
  silkscreen extent -1.27,-1.27 6.35,1.27
HDR2X3 [mm] "Connector; Header; 3x2 Position"
  rect 1.5x1.5 hole 0.9: 1(0,0)
  round 1.5 hole 0.9: 2(0,2.54) 3(2.54,0) 4(2.54,2.54) 5(5.08,0) 6(5.08,2.54)
  silkscreen extent -1.27,-1.27 6.35,3.81
HDR2X4 [mm] "Connector; Header; 4x2 Position"
  rect 1.5x1.5 hole 0.9: 1(0,0)
  round 1.5 hole 0.9: 2(0,2.54) 3(2.54,0) 4(2.54,2.54) 5(5.08,0) 6(5.08,2.54) 7(7.62,0) 8(7.62,2.54)
  silkscreen extent -1.27,-1.27 8.89,3.81
LTST-C190TBKT-2_V [mm] "SMD, 2-Leads, Body 1.6x0.8mm"
  rect 0.8x0.8 smd: 1(-0.75,0) 2(0.75,0)
  silkscreen extent 1.65,-0.4 1.65,0.4
PCBComponent_1#1 [mil]
  round 30 smd paste+0: 1(0,0)
PCBComponent_1#2 [mil]
  round 30 smd paste+0: 1(-23.62,0)
PCBComponent_1#3 [mil]
  round 30 smd paste+0: 1(-19.69,-19.68)
PTSM5 [mm]
  rect 1.575x1.575 / inner round 1.575 / far side rect 1.575x1.575 hole 1.05: 1(0,0)
  round 1.575 hole 1.05: 2(-2.5,0) 3(-5,0) 4(-7.5,0) 5(-10,0)
  silkscreen extent -12.1,-2.5 2.1,2.5
PTSM6 [mm]
  rect 1.575x1.575 / inner round 1.575 / far side rect 1.575x1.575 hole 1.05: 1(0,0)
  round 1.575 hole 1.05: 2(-2.5,0) 3(-5,0) 4(-7.5,0) 5(-10,0) 6(-12.5,0)
  silkscreen extent -14.6,-2.5 2.1,2.5
QFN37_7X7_TRI-M [mil]
  rrect75% 35x10 smd paste+0 mask+0: 2(-137,59.06) 3(-137,39.37) 4(-137,19.69) 5(-137,0) 6(-137,-19.68) 7(-137,-39.37) 8(-137,-59.05) 9(-137,-78.74) 10(-137,-98.42) 22(137,-98.42) 23(137,-78.74) 24(137,-59.05) 25(137,-19.68) 26(137,19.69) 27(137,59.06) 28(137,78.74) 29(137,98.43)
  rrect75% 10x35 smd paste+0 mask+0: 11(-98.43,-137) 12(-78.74,-137) 13(-59.06,-137) 14(-39.37,-137) 15(-19.69,-137) 16(0,-137) 17(19.68,-137) 18(39.37,-137) 19(59.06,-137) 20(78.74,-137) 21(98.43,-137) 30(78.74,137) 31(59.06,137) 32(39.37,137) 33(0,137) 34(-19.69,137) 35(-39.37,137) 36(-78.74,137) 37(-98.43,137)
  rect 161x161 smd paste-80 mask+0: 38(0,0)
  round 1 smd paste+0 mask+0: " "(-137,98.43)
  silkscreen extent -143,-143 143,143
RESC1608X55X30ML15T15 [mm] "Chip Resistor, 2-Leads, Body 1.60x0.80mm, IPC Low Density"
  rect 0.9x1.05 smd: 1(-0.725,0) 2(0.725,0)
RESC1608X55X30NL15T15 [mm] "Chip Resistor, 2-Leads, Body 1.75x0.95mm, IPC Medium Density"
  rect 0.95x0.95 smd: 1(-0.75,0) 2(0.75,0)
RESC1609X55X30LL15T15 [mm] "Chip Resistor, 2-Leads, Body 1.75x0.95mm, IPC High Density"
  rect 0.75x0.85 smd: 1(-0.65,0) 2(0.65,0)
SHDRRA4W60P0X250_1X4_1170X750X510P [mm]
  rect 1.575x1.575 / inner round 1.575 / far side rect 1.575x1.575 hole 1.05: 1(0,0)
  round 1.575 hole 1.05: 2(-2.5,0) 3(-5,0) 4(-7.5,0)
  silkscreen extent -9.6,0 2.1,7.8
SOT23_6L [mil] "SOT23_6L, 6-Leads, Body 3.60x2.9mm, Pitch 0.95mm"
  rect 44x24 smd: 1(-49.21,37.4) 2(-49.21,0) 3(-49.21,-37.4) 4(49.21,-37.4) 5(49.21,0) 6(49.21,37.4)
  silkscreen extent -109,-65 86,65
SOT-223-DB3_N [mm] "SOT223, 4-Leads, Body 6.5x3.5mm, Pitch 2.3mm, Lead Span 7mm, IPC Medium Density"
  rect 2.2x1 smd: 1(-3,2.3) 2(-3,0) 3(-3,-2.3)
  rect 2.2x3.3 smd: 4(3,0)
  silkscreen extent -3.12,-3.35 1.6,3.47
"TSON Advance_TOS" [mil]
  rect 26x15 smd paste+0 mask+0: 1(-70,38.39) 2(-70,12.8) 3(-70,-12.79) 4(-70,-38.39) 5(70,-38.39) 6(70,-12.79) 7(70,12.8) 8(70,38.39)
  silkscreen extent -66,-66 66,66
TSSOP-ST20_M [mm] "TSOP, 20-Leads, Body 6.5x4.4mm, Pitch 0.65mm, IPC Low Density"
  oval 2x0.35 smd: 1(-2.9,2.925) 2(-2.9,2.275) 3(-2.9,1.625) 4(-2.9,0.975) 5(-2.9,0.325) 6(-2.9,-0.325) 7(-2.9,-0.975) 8(-2.9,-1.625) 9(-2.9,-2.275) 10(-2.9,-2.925) 11(2.9,-2.925) 12(2.9,-2.275) 13(2.9,-1.625) 14(2.9,-0.975) 15(2.9,-0.325) 16(2.9,0.325) 17(2.9,0.975) 18(2.9,1.625) 19(2.9,2.275) 20(2.9,2.925)
  silkscreen extent -3.02,-3.3 1.5,3.78
XT60+MR60 [mm]
  rrect50% 5x5 hole 4.3 paste+0: 1(-6.35,-5.3) 1(-5.5,0) 2(0,0) 2(0.85,-5.3) 3(5.5,0)
  silkscreen extent -10.6,-9.35 10.2,4.6
XT-60 [mm] "Battery Connector"
  rect 6.8x6.8 hole 4.95: 1(4.394,4.039) 2(11.709,4.039)